# Altium PCB PCB1.PcbDoc
Units mil, origin at the board's own origin, x right, y up, seen from the top; angles counter-clockwise.
Board outline 6000 x 4000 mil, 2 copper layers (Top Layer, Bottom Layer); 128 components, 66 nets, 373 pads, 0 vias.
Unrouted connection lines stored in the file: 297.
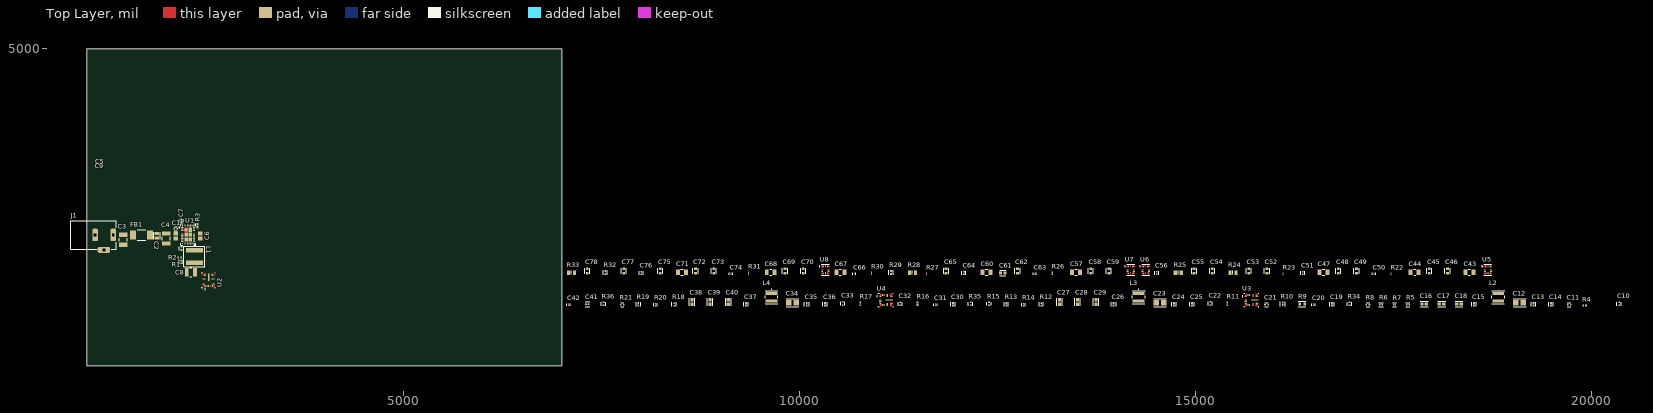
[diagram p0: Top Layer view]
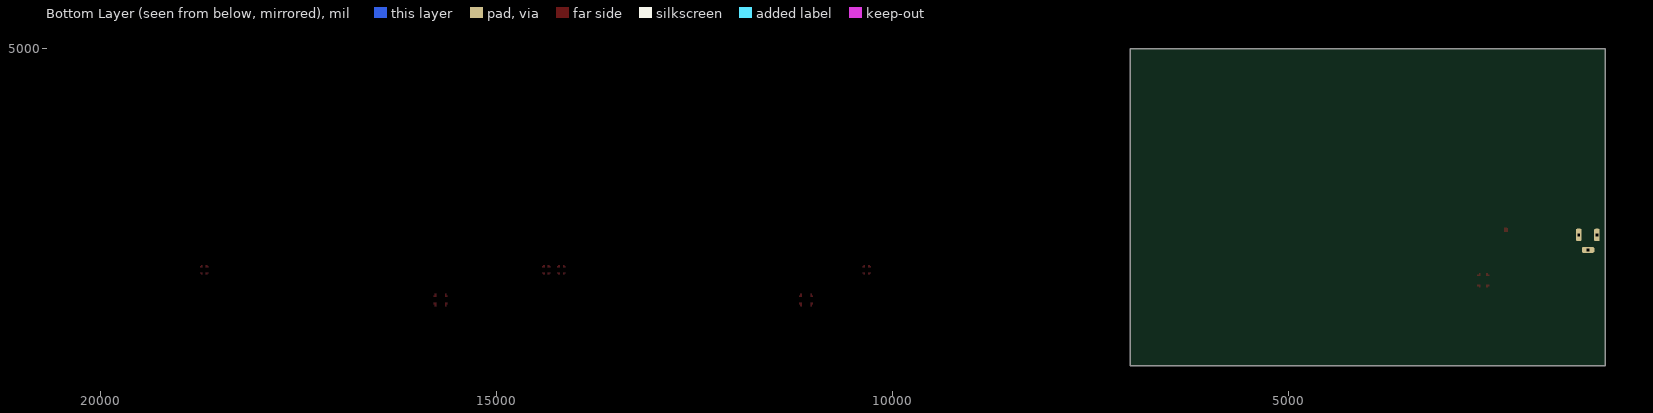
[diagram p1: Bottom Layer view, seen from below]

## Layer stack, top to bottom
Top Solder: solder mask 0.4, Solder Resist, Dk 3.5
Top Layer: signal copper 1.4
Dielectric 1: dielectric 12.6, FR-4, Dk 4.8
Bottom Layer: signal copper 1.4
Bottom Solder: solder mask 0.4, Solder Resist, Dk 3.5

## Board outline
1000,1000 7000,1000 7000,5000 1000,5000

## Design rules (kind name [scope] priority, off if disabled: settings)
Clearance [All] p1: gap=10 ignorepadtopadclearanceinfootprint=FALSE
PolygonConnect [All] p1: connectstyle=Relief reliefconductorwidth=10 reliefentries=4 polygonreliefangle="90 Angle" airgapwidth=10
RoutingVias [All] p1: holewidth=28 width=50 viastyle="Through Hole" minholewidth=28 minwidth=50 maxholewidth=28 maxwidth=50
SolderMaskExpansion [All] p1: expansion=0 istentingtop=FALSE
SupplyNets "Schematic Supply Nets_11" [InNet('1v0')] p1: voltage=0.000
SupplyNets "Schematic Supply Nets_10" [InNet('+12')] p2: voltage=0.000
SupplyNets "Schematic Supply Nets_8" [InNet('+1v3')] p3: voltage=0.000
SupplyNets "Schematic Supply Nets_7" [InNet('1v8')] p4: voltage=0.000
SupplyNets "Schematic Supply Nets_5" [InNet('3v3')] p5: voltage=0.000
SupplyNets "Schematic Supply Nets_4" [InNet('+1v8')] p6: voltage=0.000
SupplyNets "Schematic Supply Nets_3" [InNet('5V')] p7: voltage=0.000
SupplyNets "Schematic Supply Nets_2" [InNet('GND')] p8: voltage=0.000
SupplyNets "Schematic Supply Nets_1" [InNet('+3v3')] p9: voltage=0.000
SupplyNets "Schematic Supply Nets" [InNet('+5')] p10: voltage=0.000
Width [All] p1: maxlimit=10 minlimit=10 preferedwidth=10
30 further rules are at their usual default settings.

## Classes and differential pairs
component class Sheet3: C43 C44 C45 C46 C47 C48 C49 C50 C51 C52 C53 C54 C55 C56 C57 C58 C59 C60 C61 C62 C63 C64 C65 C66 C67 C68 C69 C70 C71 C72 C73 C74 C75 C76 C77 C78 R22 R23 R24 R25 R26 R27 R28 R29 R30 R31 R32 R33 U5 U6 U7 U8
component class Sheet2: C10 C11 C12 C13 C14 C15 C16 C17 C18 C19 C20 C21 C22 C23 C24 C25 C26 C27 C28 C29 C30 C31 C32 C33 C34 C35 C36 C37 C38 C39 C40 C41 C42 L2 L3 L4 R4 R5 R6 R7 R8 R9 R10 R11 R12 R13 R14 R15 R16 R17 R18 R19 R20 R21 R34 R35 R36 U2 U3 U4
component class Sheet1: C1 C2 C3 C4 C5 C6 C7 C8 C9 FB1 J1 L1 R1 R2 R3 U1

## Components (designator, comment, footprint, x,y, rotation, side; value= is the part's Value field where it differs from the comment)
C1 "1uF 0402 16V" FP-CC0402-MFG 2125,2730 r180 top value="1 uF"
C2 "4.7uF 0805 24V" FP-C0805C475K3RACAUTO-MFG 1885,2640 r270 top
C3 "2.2uF 25V 1210" CAPC1210(3225)210_M 1460,2590 r90 top value=2.2uF
C4 "2.2uF 25V 1210" CAPC1210(3225)210_M 2005,2605 r90 top value=2.2uF
C5 "0.47uf 0805" CAPC2013X145X50NL20T25 2125,2635 r90 top
C6 "0.47uf 0805" CAPC2013X145X50NL20T25 2435,2635 r90 top
C7 "4.7pF 0402" FP-C0402-BB-MFG 2195,2830 r90 top value="4.7 pF"
C8 "100uF 1210" FP-C1210C-FS-MFG 2315,2180 r180 top
C9 "0.1UF 16V 0402" FP-CC0402-0_05-0_55-L2_0-MFG 2195,2480 r270 top
C10 "1u 0402 16V" FP-CC0402-MFG 20345,1780 r90 top value="1 uF"
C11 "0u47 0402 16V" FP-CC0402-CB-MFG 19715,1770 r0 top
C12 "4u7 1206 16V" FP-C3216-160-0_2-IPC_B 19090,1795 r0 top
C13 "100n 0402 50V" FP-0402B104K500CT-IPC_C 19265,1775 r90 top
C14 "100n 0402 50V" FP-0402B104K500CT-IPC_C 19485,1775 r90 top
C15 "100n 0402 50V" FP-0402B104K500CT-IPC_C 18515,1775 r90 top
C16 "47u 0603 6V" FP-GRM188-0_2-IPC_B 17885,1780 r0 top
C17 "47u 0603 6V" FP-GRM188-0_2-IPC_B 18105,1780 r0 top
C18 "47u 0603 6V" FP-GRM188-0_2-IPC_B 18325,1780 r0 top
C19 "1n 0402 50V" FP-0402B104K500CT-IPC_C 16720,1775 r90 top
C20 "33p 0201 25V" FP-C0201-AB-MFG 16485,1770 r90 top value="33 pF"
C21 "1u 0402 16V" FP-CC0402-MFG 15895,1770 r0 top value="1 uF"
C22 "0u47 0402 16V" FP-CC0402-CB-MFG 15185,1785 r90 top
C23 "4u7 1206 16V" FP-C3216-160-0_2-IPC_B 14550,1795 r0 top
C24 "100n 0402 50V" FP-0402B104K500CT-IPC_C 14725,1775 r90 top
C25 "100n 0402 50V" FP-0402B104K500CT-IPC_C 14955,1775 r90 top
C26 "100n 0402 50V" FP-0402B104K500CT-IPC_C 13965,1775 r90 top
C27 "47u 0603 6V" FP-GRM188-0_2-IPC_B 13280,1805 r90 top
C28 "47u 0603 6V" FP-GRM188-0_2-IPC_B 13510,1805 r90 top
C29 "47u 0603 6V" FP-GRM188-0_2-IPC_B 13740,1805 r90 top
C30 "1n 0402 50V" FP-0402B104K500CT-IPC_C 11935,1775 r90 top
C31 "33p 0201 25V" FP-C0201-AB-MFG 11715,1770 r90 top value="33 pF"
C32 "1u 0402 16V" FP-CC0402-MFG 11270,1780 r90 top value="1 uF"
C33 "0u47 0402 16V" FP-CC0402-CB-MFG 10545,1785 r90 top
C34 "4u7 1206 16V" FP-C3216-160-0_2-IPC_B 9910,1795 r0 top
C35 "100n 0402 50V" FP-0402B104K500CT-IPC_C 10090,1775 r90 top
C36 "100n 0402 50V" FP-0402B104K500CT-IPC_C 10320,1775 r90 top
C37 "100n 0402 50V" FP-0402B104K500CT-IPC_C 9325,1775 r90 top
C38 "47u 0603 6V" FP-GRM188-0_2-IPC_B 8640,1805 r90 top
C39 "47u 0603 6V" FP-GRM188-0_2-IPC_B 8870,1805 r90 top
C40 "47u 0603 6V" FP-GRM188-0_2-IPC_B 9100,1805 r90 top
C41 "1n 0402 50V" FP-0402B104K500CT-IPC_C 7320,1775 r0 top
C42 "33p 0201 25V" FP-C0201-AB-MFG 7080,1770 r90 top value="33 pF"
C43 "47u 1206 16V" FP-GRM31C-0_3-e0_3_0_8-IPC_C 18455,2180 r0 top
C44 "47u 1206 16V" FP-GRM31C-0_3-e0_3_0_8-IPC_C 17765,2180 r0 top
C45 "10u 0603 16V" FP-CC0603-DC-MFG 17950,2195 r90 top
C46 "10u 0603 16V" FP-CC0603-DC-MFG 18180,2195 r90 top
C47 "47u 1206 16V" FP-GRM31C-0_3-e0_3_0_8-IPC_C 16615,2180 r0 top
C48 "10u 0603 16V" FP-CC0603-DC-MFG 16800,2195 r90 top
C49 "10u 0603 16V" FP-CC0603-DC-MFG 17030,2195 r90 top
C50 "10n 0201 16V" FP-CC0201-BA-MFG 17250,2160 r90 top value="10 nF"
C51 "100n 0402 16V" FP-C0402-BB-MFG 16350,2170 r90 top value="0.10 μF"
C52 "10u 0603 16V" FP-CC0603-DC-MFG 15900,2195 r90 top
C53 "10u 0603 16V" FP-CC0603-DC-MFG 15670,2195 r90 top
C54 "10u 0603 16V" FP-CC0603-DC-MFG 15210,2195 r90 top
C55 "10u 0603 16V" FP-CC0603-DC-MFG 14980,2195 r90 top
C56 "100n 0402 16V" FP-C0402-BB-MFG 14510,2170 r90 top value="0.10 μF"
C57 "47u 1206 16V" FP-GRM31C-0_3-e0_3_0_8-IPC_C 13490,2180 r0 top
C58 "10u 0603 16V" FP-CC0603-DC-MFG 13675,2195 r90 top
C59 "10u 0603 16V" FP-CC0603-DC-MFG 13905,2195 r90 top
C60 "47u 1206 16V" FP-GRM31C-0_3-e0_3_0_8-IPC_C 12360,2180 r0 top
C61 "10u 0603 16V" FP-CC0603-DC-MFG 12565,2170 r0 top
C62 "10u 0603 16V" FP-CC0603-DC-MFG 12750,2195 r90 top
C63 "10n 0201 16V" FP-CC0201-BA-MFG 12970,2160 r90 top value="10 nF"
C64 "100n 0402 16V" FP-C0402-BB-MFG 12075,2170 r90 top value="0.10 μF"
C65 "10u 0603 16V" FP-CC0603-DC-MFG 11850,2195 r90 top
C66 "10n 0201 16V" FP-CC0201-BA-MFG 10690,2160 r90 top value="10 nF"
C67 "47u 1206 16V" FP-GRM31C-0_3-e0_3_0_8-IPC_C 10515,2180 r0 top
C68 "47u 1206 16V" FP-GRM31C-0_3-e0_3_0_8-IPC_C 9635,2180 r0 top
C69 "10u 0603 16V" FP-CC0603-DC-MFG 9815,2195 r90 top
C70 "10u 0603 16V" FP-CC0603-DC-MFG 10045,2195 r90 top
C71 "47u 1206 16V" FP-GRM31C-0_3-e0_3_0_8-IPC_C 8515,2180 r0 top
C72 "10u 0603 16V" FP-CC0603-DC-MFG 8685,2195 r90 top
C73 "10u 0603 16V" FP-CC0603-DC-MFG 8915,2195 r90 top
C74 "10n 0201 16V" FP-CC0201-BA-MFG 9135,2160 r90 top value="10 nF"
C75 "10u 0603 16V" FP-CC0603-DC-MFG 8240,2195 r90 top
C76 "100n 0402 16V" FP-C0402-BB-MFG 8000,2170 r90 top value="0.10 μF"
C77 "10u 0603 16V" FP-CC0603-DC-MFG 7780,2195 r90 top
C78 "10u 0603 16V" FP-CC0603-DC-MFG 7320,2195 r90 top
FB1 "74279226101" WE-MPSB_1812_L4.5W3.2H2.3 1690,2650 r0 top
J1 "694108301002" 694108301002 1085,2650 r270 top
L1 "XEL6030-102MEC" FP-XEL6030-3_1-MFG 2360,2380 r270 top
L2 "2u2 NonStandard 3.8A Isat" SRP4020FA2R2M 18820,1865 r0 top
L3 "2u2 NonStandard 3.8A Isat" SRP4020FA2R2M 14280,1865 r0 top
L4 "2u2 NonStandard 3.8A Isat" SRP4020FA2R2M 9645,1865 r0 top
R1 "1M 0402" FP-MCS0402-IPC_C 2195,2310 r270 top
R2 "243k 0402" RESC1005X40X25NL05T05 2175,2365 r0 top
R3 "M55342E04B26B5RT5" RESC1005X40X25ML10T10 2400,2765 r270 top
R4 "10k 0402 PullUp" RESC1005X40X20NL05T10 19910,1760 r0 top
R5 "0 0402 DNP" FP-CRCW0402-e3-IPC_C 17680,1770 r0 top
R6 "100k 0402 1%" FP-CRGCQ0402-IPC_C 17340,1770 r0 top value=100KΩ
R7 "1k 0201 DNP" FP-AF0201-IPC_B 17510,1770 r0 top
R8 "100 0402 DNP" FP-AC0402-MFG 17175,1770 r0 top
R9 "40k 0603" FP-AT0603-IPC_B 16345,1780 r0 top
R10 "5k 0402" FP-PNM0402-IPC_C 16100,1780 r90 top
R11 "10k 0402 PullUp" RESC1005X40X20NL05T10 15400,1780 r90 top
R12 "0 0402 DNP" FP-CRCW0402-e3-IPC_C 13050,1775 r90 top
R13 "100k 0402 1%" FP-CRGCQ0402-IPC_C 12610,1775 r90 top value=100KΩ
R14 "1k 0201 DNP" FP-AF0201-IPC_B 12825,1770 r90 top
R15 "100 0402 DNP" FP-AC0402-MFG 12390,1780 r90 top
R16 "125k 0402 1%" RESC1005X40X25NL10T10 11490,1780 r90 top
R17 "10k 0402 PullUp" RESC1005X40X20NL05T10 10765,1780 r90 top
R18 "0 0402 DNP" FP-CRCW0402-e3-IPC_C 8415,1775 r90 top
R19 "100k 0402 1%" FP-CRGCQ0402-IPC_C 7965,1775 r90 top value=100KΩ
R20 "1k 0201 DNP" FP-AF0201-IPC_B 8180,1770 r90 top
R21 "100 0402 DNP" FP-AC0402-MFG 7760,1770 r0 top
R22 "11k8 0201 1%" RESC0603X28X15LL05T05 17465,2160 r90 top
R23 "3k74 0201 1%" RESC0603X28X15LL05T05 16105,2160 r90 top
R24 "250k 0805 0%1" RESC2012X65N 15470,2175 r0 top
R25 "250k 0805 0%1" RESC2012X65N 14780,2175 r0 top
R26 "12k4 0201 1%" RESC0603X26X15NL03T05 13190,2165 r90 top
R27 "10k 0201 1%" RESC0603X28X15LL05T05 11600,2160 r90 top
R28 "250k 0805 0%1" RESC2012X65N 11425,2175 r0 top
R29 "19.3 0402 0%5" FP-RN73R1E-IPC_B 11155,2175 r90 top
R30 "12k1 0201 1%" RESC0603X26X15NL03T05 10910,2165 r90 top
R31 "12k1 0201 1%" RESC0603X26X15NL03T05 9355,2165 r90 top
R32 "19.3 0402 0%5" FP-RN73R1E-IPC_B 7545,2175 r90 top
R33 "250k 0805 0%1" RESC2012X65N 7120,2175 r0 top
R34 "AF0402FR-0726K1L" FP-AF0402-MFG 16940,1780 r90 top
R35 "AF0402FR-0726K1L" FP-AF0402-MFG 12160,1780 r90 top
R36 "AF0402FR-0726K1L" FP-AF0402-MFG 7525,1780 r90 top
U1 "LT8645SIV#PBF" FP-LQFN-32-05-08-1512-MFG 2280,2655 r0 top
U2 "LM61460AANRJRR" FP-RJR0014A-MFG 2539.33,2077.83 r90 top
U3 "LM61460AANRJRR" FP-RJR0014A-MFG 15705,1830 r0 top
U4 "LM61460AANRJRR" FP-RJR0014A-MFG 11090,1830 r0 top
U5 "TPS7A5201RPST" FP-RPS0012A-MFG 18690,2210 r0 top
U6 "TPS7A5201RPST" FP-RPS0012A-MFG 14370,2210 r0 top
U7 "TPS7A5201RPST" FP-RPS0012A-MFG 14180,2210 r0 top
U8 "TPS7A5201RPST" FP-RPS0012A-MFG 10325,2210 r0 top

## Footprints (in the part's own frame and the unit in brackets; to place one, negate y for a bottom-side part, rotate by r counter-clockwise, add the part's x,y. Pads: shape width x height; smd on the part's side, far side on the other; paste and mask are expansions set on the pad)
694108301002 [mm] "DC Power Jack Right Angled(6.4)"
  rrect50% 4x1.8 hole 0.8 square: 1(0,6.35) 2(0,0.55)
  rrect50% 1.8x4 hole 0.8 square: 3(4.8,3.35)
  silkscreen extent -4.5,-7.25 4.5,7.25, body extent -4.5,-7.25 5,7.25, height 10.75
CAPC1210(3225)210_M [mm] "Chip Capacitor, Body 3.2x2.5mm, Height 2.1mm, IPC Low Density"
  rect 1.35x2.8 smd: 1(-1.6,0) 2(1.6,0)
  silkscreen extent -0.55,-1.3 0.55,1.3, body extent -1.7,-1.35 1.7,1.35, height 2.1
CAPC2013X145X50NL20T25 [mm] "Chip Capacitor, 2-Leads, Body 2.00x1.25mm, IPC Medium Density"
  rect 1.3x1.45 smd: 1(-0.8,0) 2(0.8,0)
  body extent -1.1,-0.72 1.1,0.72, height 1.45
FP-0402B104K500CT-IPC_C [mil]
  rect 23.85x23.87 smd paste+0 mask+0: 1(-15.76,0) 2(15.76,0)
  silkscreen extent -28,-30 28,30, body extent -32,-18 32,18, height 10
FP-AC0402-MFG [mm]
  rect 0.5x0.6 smd paste+0 mask+0: 1(-0.5,0) 2(0.5,0)
  silkscreen extent -0.5,-0.67 0.5,0.67, body extent -0.85,-0.4 0.85,0.4, height 0.25
FP-AF0201-IPC_B [mil]
  rect 17.88x14.28 smd paste+0 mask+0: 1(-11.98,0) 2(11.98,0)
  silkscreen extent -21,-23 21,23, body extent -27,-13 27,13, height 10
FP-AF0402-MFG [mm]
  rect 0.5x0.6 smd paste+0 mask+0: 1(-0.5,0) 2(0.5,0)
  silkscreen extent -0.53,-0.72 0.53,0.72, body extent -0.85,-0.4 0.85,0.4, height 0.25
FP-AT0603-IPC_B [mil]
  rect 33.81x35.91 smd paste+0 mask+0: 1(-30.58,0) 2(30.58,0)
  silkscreen extent -47,-34 47,34, body extent -57,-28 57,28, height 10
FP-C0201-AB-MFG [mm]
  rect 0.36x0.32 smd paste+0 mask+0: 1(-0.28,0) 2(0.28,0)
  silkscreen extent -0.3,-0.55 0.3,0.55
FP-C0402-BB-MFG [mm]
  rect 0.52x0.52 smd paste+0 mask+0: 1(-0.4,0) 2(0.4,0)
  silkscreen extent -0.5,-0.64 0.5,0.64, body extent -0.8,-0.4 0.8,0.4, height 0.25
FP-C0805C475K3RACAUTO-MFG [mm]
  rect 0.95x1.35 smd paste+0 mask+0: 1(-0.75,0) 2(0.75,0)
  silkscreen extent -1.15,-1.05 1.15,1.05, body extent -1.4,-0.85 1.4,0.85, height 0.25
FP-C1210C-FS-MFG [mm]
  rect 1.2x2.7 smd paste+0 mask+0: 1(-1.3,0) 2(1.3,0)
  silkscreen extent -0.33,-1.4 0.33,1.4, body extent -2,-1.5 2,1.5, height 0.25
FP-C3216-160-0_2-IPC_B [mil]
  rect 69.05x71.11 smd paste+0 mask+0: 1(-46.3,0) 2(46.3,0)
  silkscreen extent -81,-51 81,51, body extent -91,-45 91,45, height 10
FP-CC0201-BA-MFG [mm]
  rect 0.28x0.3 smd paste+0 mask+0: 1(-0.265,0) 2(0.265,0)
  silkscreen extent -0.32,-0.53 0.32,0.53, body extent -0.51,-0.27 0.51,0.27, height 0.25
FP-CC0402-0_05-0_55-L2_0-MFG [mm]
  rect 0.5x0.6 smd paste+0 mask+0: 1(-0.5,0) 2(0.5,0)
  silkscreen extent -0.53,-0.7 0.53,0.7, body extent -0.85,-0.4 0.85,0.4, height 0.25
FP-CC0402-CB-MFG [mm]
  rect 0.5x0.5 smd paste+0 mask+0: 1(-0.5,0) 2(0.5,0)
  silkscreen extent -0.53,-0.68 0.53,0.67, body extent -0.95,-0.55 0.95,0.55, height 0.25
FP-CC0402-MFG [mm]
  rect 0.5x0.5 smd paste+0 mask+0: 1(-0.5,0) 2(0.5,0)
  silkscreen extent -0.53,-0.68 0.53,0.67, body extent -0.87,-0.48 0.87,0.48, height 0.25
FP-CC0603-DC-MFG [mm]
  rect 0.9x0.9 smd paste+0 mask+0: 1(-0.7,0) 2(0.7,0)
  silkscreen extent -0.9,-0.82 0.9,0.82, body extent -1.35,-0.75 1.35,0.75, height 0.25
FP-CRCW0402-e3-IPC_C [mil]
  rect 18.43x18.6 smd paste+0 mask+0: 1(-15.83,0) 2(15.83,0)
  silkscreen extent -25,-27 25,27, body extent -29,-15 29,15, height 10
FP-CRGCQ0402-IPC_C [mil]
  rect 22.03x18.6 smd paste+0 mask+0: 1(-14.81,0) 2(14.81,0)
  silkscreen extent -26,-27 26,27, body extent -30,-15 30,15, height 10
FP-GRM31C-0_3-e0_3_0_8-IPC_C [mil]
  rect 49.35x71.03 smd paste+0 mask+0: 1(-50.21,0) 2(50.21,0)
  silkscreen extent -14,-37 14,37, body extent -79,-41 79,41, height 10
FP-GRM188-0_2-IPC_B [mil]
  rect 43.51x39.61 smd paste+0 mask+0: 1(-27.58,0) 2(27.58,0)
  silkscreen extent -49,-36 49,36, body extent -59,-30 59,30, height 10
FP-LQFN-32-05-08-1512-MFG [mm]
  rect 0.7x0.25 smd paste+0 mask+0: 1(-1.9,2.25) 2(-1.9,1.75) 3(-1.9,1.25) 4(-1.9,0.75) 5(-1.9,0.25) 6(-1.9,-0.25) 7(-1.9,-0.75) 8(-1.9,-1.25) 9(-1.9,-1.75) 10(-1.9,-2.25) 17(1.9,-2.25) 18(1.9,-1.75) 19(1.9,-1.25) 20(1.9,-0.75) 21(1.9,-0.25) 22(1.9,0.25) 23(1.9,0.75) 24(1.9,1.25) 25(1.9,1.75) 26(1.9,2.25)
  rect 0.25x0.7 smd paste+0 mask+0: 11(-1.25,-2.9) 12(-0.75,-2.9) 13(-0.25,-2.9) 14(0.25,-2.9) 15(0.75,-2.9) 16(1.25,-2.9) 27(1.25,2.9) 28(0.75,2.9) 29(0.25,2.9) 30(-0.25,2.9) 31(-0.75,2.9) 32(-1.25,2.9)
  round 1.012 smd paste+0 mask+0: 33(-0.663,1.548)
  rect 1.125x1.355 smd paste+0 mask+0: 34(0.663,1.548) 37(-0.663,-1.548) 38(0.663,-1.548)
  rect 1.125x1.34 smd paste+0 mask+0: 35(-0.663,0) 36(0.663,0)
  rect 0.375x0.375 smd paste+0 mask+0: 39(-1.813,2.812) 40(1.813,2.812) 41(-1.813,-2.812) 42(1.813,-2.812)
  Top Layer region: -0.1,2.225 -0.975,2.225 -1.225,1.975 -1.225,0.87 -0.1,0.87 -0.1,2.225
  silkscreen extent -2.97,-3.4 2.4,3.4, body extent -2.35,-3.35 2.35,3.35, height 0.25
FP-MCS0402-IPC_C [mil]
  rect 18.32x18.6 smd paste+0 mask+0: 1(-15.89,0) 2(15.89,0)
  silkscreen extent -25,-27 25,27, body extent -29,-15 29,15, height 10
FP-PNM0402-IPC_C [mil]
  rect 26.11x23.44 smd paste+0 mask+0: 1(-16,0) 2(16,0)
  silkscreen extent -29,-29 29,29, body extent -33,-17 33,17, height 10
FP-RJR0014A-MFG [mm]
  round 0.394 smd paste-1000 mask+0: 1(-1.806,1.169) 5(-1.719,-1.206)
  rrect40% 0.7x0.25 smd paste+0 mask+0: 2(-1.85,0.525) 4(-1.85,-0.525)
  rrect33% 0.7x0.3 smd paste+0 mask+0: 3(-1.85,0)
  rrect40% 0.25x0.7 smd paste+0 mask+0: 6(-1.125,-1.6) 7(-0.625,-1.6) 13(-0.625,1.6) 14(-1.125,1.6)
  rrect25% 0.4x1 smd paste+0 mask+0: 8(0.45,-1.45) 12(0.45,1.45)
  round 0.45 smd paste-1000 mask+0: 9(1.65,-1.2) 11(1.65,1.2)
  rrect25% 2.4x0.4 smd paste-1000 mask+0: 10(1,0)
  Top Layer region: 1.45,-1.95 1.75,-1.95 1.769,-1.946 1.785,-1.935 1.796,-1.919 1.8,-1.9 1.8,-1.9 1.8,-1.47 1.816,-1.41 1.86,-1.366 1.92,-1.35 1.92,-1.35 2.15,-1.35 2.169,-1.346 2.185,-1.335 2.196,-1.319 2.2,-1.3 2.2,-1.3 2.2,-1 2.193,-0.975 2.175,-0.957 2.15,-0.95 2.15,-0.95 1.45,-0.95 1.431,-0.954 1.415,-0.965 1.404,-0.981 1.4,-1 1.4,-1 1.4,-1.9 1.404,-1.919 1.415,-1.935 1.431,-1.946 1.45,-1.95 1.45,-1.95
  Top Layer region: 1.45,1.95 1.75,1.95 1.769,1.946 1.785,1.935 1.796,1.919 1.8,1.9 1.8,1.9 1.8,1.47 1.816,1.41 1.86,1.366 1.92,1.35 1.92,1.35 2.15,1.35 2.169,1.346 2.185,1.335 2.196,1.319 2.2,1.3 2.2,1.3 2.2,1 2.193,0.975 2.175,0.957 2.15,0.95 2.15,0.95 1.45,0.95 1.431,0.954 1.415,0.965 1.404,0.981 1.4,1 1.4,1 1.4,1.9 1.404,1.919 1.415,1.935 1.431,1.946 1.45,1.95 1.45,1.95
  Top Layer region: -1.55,-1.95 -1.531,-1.946 -1.515,-1.935 -1.504,-1.919 -1.5,-1.9 -1.5,-1.9 -1.5,-1 -1.507,-0.975 -1.525,-0.957 -1.55,-0.95 -1.55,-0.95 -2.15,-0.95 -2.175,-0.957 -2.193,-0.975 -2.2,-1 -2.2,-1 -2.2,-1.3 -2.196,-1.319 -2.185,-1.335 -2.169,-1.346 -2.15,-1.35 -2.15,-1.35 -1.97,-1.35 -1.924,-1.359 -1.885,-1.385 -1.859,-1.424 -1.85,-1.47 -1.85,-1.47 -1.85,-1.9 -1.846,-1.919 -1.835,-1.935 -1.819,-1.946 -1.8,-1.95 -1.8,-1.95 -1.8,-1.95
  Top Layer region: -1.8,1.95 -1.55,1.95 -1.531,1.946 -1.515,1.935 -1.504,1.919 -1.5,1.9 -1.5,1.9 -1.5,1 -1.507,0.975 -1.525,0.957 -1.55,0.95 -1.55,0.95 -2.15,0.95 -2.175,0.957 -2.193,0.975 -2.2,1 -2.2,1 -2.2,1.3 -2.196,1.319 -2.185,1.335 -2.169,1.346 -2.15,1.35 -2.15,1.35 -1.97,1.35 -1.924,1.359 -1.885,1.385 -1.859,1.424 -1.85,1.47 -1.85,1.47 -1.85,1.9 -1.846,1.919 -1.835,1.935 -1.819,1.946 -1.8,1.95 -1.8,1.95
  silkscreen extent -3.02,-2.15 2.4,2.15, body extent -2.3,-2.05 2.3,2.05, height 0.25
FP-RN73R1E-IPC_B [mil]
  rect 23.14x22.54 smd paste+0 mask+0: 1(-18.27,0) 2(18.27,0)
  silkscreen extent -30,-27 30,27, body extent -36,-17 36,17, height 10
FP-RPS0012A-MFG [mm]
  round 0.34 smd paste+0 mask+0: 1(-0.761,1.127) 5(-0.761,-1.127)
  rrect40% 1.05x0.25 smd paste+0 mask+0: 2(-0.775,0.5) 10(0.775,0.5)
  rrect40% 0.6x0.25 smd paste+0 mask+0: 3(-1,0) 4(-1,-0.5) 8(1,-0.5) 9(1,0)
  rrect40% 0.25x0.8 smd paste+0 mask+0: 6(0,-1.05)
  round 0.332 smd paste+0 mask+0: 7(0.766,-1.091) 11(0.766,1.091)
  rrect40% 0.25x0.6 smd paste+0 mask+0: 12(0,1.15)
  Top Layer region: 1.25,-1.1 0.95,-1.1 0.95,-1.4 0.946,-1.419 0.935,-1.435 0.919,-1.446 0.9,-1.45 0.9,-1.45 0.6,-1.45 0.581,-1.446 0.565,-1.435 0.554,-1.419 0.55,-1.4 0.55,-1.4 0.55,-0.925 0.554,-0.906 0.565,-0.89 0.581,-0.879 0.6,-0.875 0.6,-0.875 1.25,-0.875 1.269,-0.879 1.285,-0.89 1.296,-0.906 1.3,-0.925 1.3,-0.925 1.3,-1.05 1.296,-1.069 1.285,-1.085 1.269,-1.096 1.25,-1.1
  Top Layer region: 1.25,1.1 0.95,1.1 0.95,1.4 0.946,1.419 0.935,1.435 0.919,1.446 0.9,1.45 0.9,1.45 0.6,1.45 0.581,1.446 0.565,1.435 0.554,1.419 0.55,1.4 0.55,1.4 0.55,0.925 0.554,0.906 0.565,0.89 0.581,0.879 0.6,0.875 0.6,0.875 1.25,0.875 1.269,0.879 1.285,0.89 1.296,0.906 1.3,0.925 1.3,0.925 1.3,1.05 1.296,1.069 1.285,1.085 1.269,1.096 1.25,1.1
  Top Layer region: -1.25,-1.1 -0.95,-1.1 -0.95,-1.4 -0.946,-1.419 -0.935,-1.435 -0.919,-1.446 -0.9,-1.45 -0.9,-1.45 -0.6,-1.45 -0.581,-1.446 -0.565,-1.435 -0.554,-1.419 -0.55,-1.4 -0.55,-1.4 -0.55,-0.925 -0.554,-0.906 -0.565,-0.89 -0.581,-0.879 -0.6,-0.875 -0.6,-0.875 -1.25,-0.875 -1.269,-0.879 -1.285,-0.89 -1.296,-0.906 -1.3,-0.925 -1.3,-0.925 -1.3,-1.05 -1.296,-1.069 -1.285,-1.085 -1.269,-1.096 -1.25,-1.1
  Top Layer region: -1.25,1.1 -0.95,1.1 -0.95,1.4 -0.943,1.425 -0.925,1.443 -0.9,1.45 -0.9,1.45 -0.6,1.45 -0.581,1.446 -0.565,1.435 -0.554,1.419 -0.55,1.4 -0.55,1.4 -0.55,0.925 -0.554,0.906 -0.565,0.89 -0.581,0.879 -0.6,0.875 -0.6,0.875 -1.25,0.875 -1.269,0.879 -1.285,0.89 -1.296,0.906 -1.3,0.925 -1.3,0.925 -1.3,1.05 -1.293,1.075 -1.275,1.093 -1.25,1.1
  silkscreen extent -1.97,-1.8 1.3,1.8, body extent -1.4,-1.55 1.4,1.55, height 0.25
FP-XEL6030-3_1-MFG [mm]
  rect 1.43x5.5 smd paste+0 mask+0: 1(-2.02,0) 2(2.02,0)
  silkscreen extent -3.9,-3.38 3.28,3.38, body extent -3.38,-3.48 3.38,3.48, height 0.25
RESC0603X26X15NL03T05 [mm] "Chip Resistor, 2-Leads, Body 0.60x0.30mm, IPC Medium Density"
  rect 0.45x0.35 smd: 1(-0.325,0) 2(0.325,0)
  body extent -0.32,-0.16 0.32,0.17, height 0.26
RESC0603X28X15LL05T05 [mm] "Chip Resistor, 2-Leads, Body 0.60x0.30mm, IPC High Density"
  rect 0.35x0.25 smd: 1(-0.275,0) 2(0.275,0)
  body extent -0.33,-0.17 0.32,0.18, height 0.28
RESC1005X40X20NL05T10 [mm] "Chip Resistor, 2-Leads, Body 1.00x0.50mm, IPC Medium Density"
  rect 0.55x0.55 smd: 1(-0.45,0) 2(0.45,0)
  body extent -0.53,-0.27 0.53,0.28, height 0.4
RESC1005X40X25ML10T10 [mm] "Chip Resistor, 2-Leads, Body 1.00x0.50mm, IPC Low Density"
  rect 0.75x0.7 smd: 1(-0.475,0) 2(0.475,0)
  body extent -0.55,-0.3 0.55,0.3, height 0.4
RESC1005X40X25NL05T05 [mm] "Chip Resistor, 2-Leads, Body 1.00x0.50mm, IPC Medium Density"
  rect 0.55x0.55 smd: 1(-0.45,0) 2(0.45,0)
  body extent -0.53,-0.27 0.53,0.28, height 0.4
RESC1005X40X25NL10T10 [mm] "Chip Resistor, 2-Leads, Body 1.00x0.50mm, IPC Medium Density"
  rect 0.65x0.6 smd: 1(-0.425,0) 2(0.425,0)
  body extent -0.55,-0.3 0.55,0.3, height 0.4
RESC2012X65N [mm]
  rect 1x1.45 smd: 1(-0.95,0) 2(0.95,0)
  silkscreen extent 0,-0.53 0,0.53, body extent -1,-0.63 1,0.62, height 0.55
SRP4020FA2R2M [mm]
  rect 3.8x1 smd: 1(0,1.2) 2(0,-1.2)
  silkscreen extent -2.05,-2.05 2.05,2.6, body extent -2.05,-2.05 2.05,2.05, height 1.91
WE-MPSB_1812_L4.5W3.2H2.3 [mm] "SMD EMI Multilayer Power Suppression Bead, body 4.50x3.20mm"
  rect 1.9x3 smd: 1(-2.7,0) 2(2.7,0)
  silkscreen extent -1.4,-1.73 1.4,1.73, body extent -2.25,-1.6 2.25,1.6, height 2.3

## Part data
C1: library part CMP-03422-000064-1, "CC0402 1 uF X5R 10.00% 16 V", Capacitance="1 uF", Manufacturer=YAGEO, Manufacturer Part Number=CC0402KPX5R7BB105, Package=CC0402, Temperature="-55°C to +125°C", Temperature Characteristic=X5R, Temperature Coefficient=30ppm/°C, Temperature Range High=+125°C, Temperature Range Low=-55°C, Tolerance=0.1, Voltage Rating="16 V", Automotive=No, Automotive Grade=NA, Category=Cap, ComponentLink2Description=Datasheet, ComponentLink2URL=http://www.yageo.com/documents/recent/UPY-GP_NP0_16V-to-50V_16.pdf, Device Class L1="Passive Components", Device Class L2=Capacitors, Device Class L3="Ceramic Capacitors", Footprint Url=http://www.yageo.com/exep/pages/download/literatures/UPY-C_GEN_24.pdf, Height=0.55mm, Ipc Land Pattern Name=CAPC10050X50, Lead Free=Yes, Material=Ceramic, Octopart=https://octopart.com/cc0402kpx5r7bb105-yageo-89998189, RoHS=TRUE
C2: library part CMP-03020-034682-1, "CAP CER 0805 4.7UF 25V X7R  10%", RoHS Compliant=Yes
C3 C4: library part CMP-1038-02085-1, "CAP 2.2uF 25V ±5% 1210 (3225 Metric) Thickness 2.05mm SMD", Case-EIA=1210, Case-Metric=3225, Rated Voltage="25 V", Tolerance=Â±5%, Max Thickness="2.05 mm", Technology=SMT
C5 C6: library part CMP-2007-01148-1, Manufacturer=Kemet, Part Number=C0805C474K3RALTU
C7: library part CMP-03020-005498-1, "C0402 4.7 pF C0G 0.1 pF 50 V", Capacitance="4.7 pF", Manufacturer=Kemet, Manufacturer Part Number=C0402C479B5GACAUTO, Package=C0402-BB, Temperature="-55°C to +125°C", Temperature Characteristic=C0G, Temperature Coefficient=15%, Temperature Range High=+125°C, Temperature Range Low=-55°C, Tolerance="0.1 pF", Voltage Rating="50 V", Automotive=No, Category=Cap, ComponentLink2Description=Datasheet, ComponentLink2URL=https://content.kemet.com/datasheets/KEM_C1002_X7R_SMD.pdf, Device Class L1="Passive Components", Device Class L2=Capacitors, Device Class L3="Ceramic Capacitors", Height=0.55mm, Ipc Land Pattern Name=CAPC10050X50, Lead Free=Yes, Material=Ceramic, Mouser Description="Cap Ceramic 4.7pF 50V C0G 0.1pF SMD 0402 125°C T/R", Octopart=https://octopart.com/c0402c479b5gacauto-kemet-87334100, RoHS=TRUE
C8: library part CMP-03020-034653-1, "CAP CER 100UF 16V X5R 1210", Capacitance=100uF, Case Code (Imperial)=1210, Case Code (Metric)=3225, Dielectric=X5R, Dielectric Material=Ceramic, Max Operating Temperature=85°C, Min Operating Temperature=-55°C, Package Quantity=1000, Tolerance=20%, Voltage Rating=16V, Case/Package=1210, Depth=2.5mm, Lead Free="Lead Free", Length=3.2mm, Packaging="Tape and Reel", REACH SVHC="No SVHC", Termination=SMD/SMT, Thickness=0.106inch, Voltage Rating (DC)=16V, Weight=0.000564oz, Width=0.098inch
C9: library part CMP-03422-001485-1, "CAP CER 0.1UF 16V X7R 0402", Capacitance=100nF, Case Code (Imperial)=0402, Case Code (Metric)=1005, Dielectric=X7R, Max Operating Temperature=125°C, Min Operating Temperature=-55°C, Package Quantity=10000, Resistor Type=Ceramic, Tolerance=5%, Voltage Rating=16V, Case/Package=0402, Construction=Flat, Depth=0.5mm, Halogen Free="Halogen Free", Height=0.5mm, Lead Free="Lead Free", Length=1mm, Mount="Surface Mount", Packaging="Tape and Reel", Radiation Hardening=No, RoHS Compliant=Yes, Series=CC, Thickness=0.022inch, Voltage Rating (DC)=16V, Width=0.02inch
C10 C21 C32: library part CMP-03422-001191-1, "CAP CER 1UF 16V X5R 0402", Capacitance="1 uF", Manufacturer=YAGEO, Manufacturer Part Number=CC0402KRX5R7BB105, Package=CC0402, Temperature="-55°C to +125°C", Temperature Characteristic=X5R, Temperature Coefficient=30ppm/°C, Temperature Range High=+125°C, Temperature Range Low=-55°C, Tolerance=0.1, Voltage Rating="16 V", Automotive=No, Automotive Grade=NA, Category=Cap, ComponentLink2Description=Datasheet, ComponentLink2URL=http://www.yageo.com/documents/recent/UPY-GP_NP0_16V-to-50V_16.pdf, Device Class L1="Passive Components", Device Class L2=Capacitors, Device Class L3="Ceramic Capacitors", Digikey Description="CAP CER 1UF 16V X5R 0402", Footprint Url=http://www.yageo.com/exep/pages/download/literatures/UPY-C_GEN_24.pdf, Height=0.55mm, Ipc Land Pattern Name=CAPC10050X50, Lead Free=Yes, Material=Ceramic, Mouser Description="0402 1 uF 16 V ±10% Tolerance X5R Multilayer Ceramic Chip Capacitor", Octopart=https://octopart.com/cc0402krx5r7bb105-yageo-25629500, RoHS=TRUE
C11 C22 C33: library part CMP-03422-000370-2, "CAP CER 0.47UF 16V X5R 0402", Capacitance=470nF, Case/Package=0402, Max Operating Temperature=85°C, Min Operating Temperature=-55°C, Tolerance=10%, Voltage Rating=16V, Halogen Free="Halogen Free", Lead Free="Lead Free", Length=0.039inch, Mount="Surface Mount", Packaging="Tape and Reel", RoHS Compliant=Yes, Thickness=0.022inch, Voltage Rating (DC)=16V, Width=0.02inch
C12 C23 C34: library part CMP-08246-006479-1, "Multilayer Ceramic Capacitors 4.7uF ±20% 16V X7R SMD 1206", Capacitance=4.7uF, Case Code (Imperial)=1206, Case Code (Metric)=3216, Dielectric=X7R, Max Operating Temperature=125°C, Min Operating Temperature=-55°C, Package Quantity=1, Resistor Type=Ceramic, Tolerance=20%, Voltage Rating=16V, Case/Package=1206, Depth=1.6mm, Features="Soft Termination", Height=1.6mm, Length=0.126inch, Mount="Surface Mount", Number of Pins=2, Packaging="Tape and Reel", RoHS Compliant=Yes, Series=C, Termination=SMD/SMT, Thickness=0.071inch, Voltage Rating (DC)=16V, Weight=0.000571oz, Width=0.063inch
C13 C14 C15 C19 C24 C25 C26 C30 C35 C36 C37 C41: library part CMP-45632-000010-1, "CAP CER 0.1UF 50V X7R 0402", Capacitance=100nF, Case Code (Imperial)=0402, Case Code (Metric)=1005, Max Operating Temperature=125°C, Min Operating Temperature=-55°C, Tolerance=10%, Voltage Rating=50V, Case/Package=0402, Mount="Surface Mount", Packaging="Cut Tape", RoHS Compliant=Yes, Series=-
C16 C17 C18 C27 C28 C29 C38 C39 C40: library part CMP-2000-05444-2, "Chip Multilayer Ceramic Capacitors for General Purpose, 0603, 47uF, X5R, 15%, 20%, 6.3V", Capacitance=47uF, Case Code (Imperial)=0603, Case Code (Metric)=1608, Dielectric=X5R, Max Operating Temperature=85°C, Min Operating Temperature=-55°C, Tolerance=20%, Voltage Rating=6.3V, Case/Package=0603, Length=0.063inch, Mount="Surface Mount", Packaging="Tape and Reel", Thickness=0.039inch, Voltage Rating (DC)=6.3V, Width=0.031inch
C20 C31 C42: library part CMP-03020-011228-1, "CAP CER 33PF 25V 5% NP0 0201", Capacitance="33 pF", Manufacturer=KEMET, Manufacturer Part Number=C0201C330J3GACTU, Package=C0201-AB, Temperature="-55°C to +125°C", Temperature Characteristic=C0G, Temperature Coefficient=30ppm/°C, Temperature Range High=+125°C, Temperature Range Low=-55°C, Tolerance=0.05, Voltage Rating="25 V", Automotive=No, Category=Cap, ComponentLink2Description=Datasheet, ComponentLink2URL=https://content.kemet.com/datasheets/KEM_C1003_C0G_SMD.pdf, Device Class L1="Passive Components", Device Class L2=Capacitors, Device Class L3="Ceramic Capacitors", Digikey Description="CAP CER 33PF 25V 5% NP0 0201", Height=0.33mm, Ipc Land Pattern Name=CAPC6030X30, Lead Free=Yes, Material=Ceramic, Mouser Description="Multilayer Ceramic Capacitors MLCC - SMD/SMT 25volts 33pF C0G 5%", Octopart=https://octopart.com/c0201c330j3gactu-kemet-16237019, RoHS=TRUE, Standoff Height=0mm
C43 C44 C47 C57 C60 C67 C68 C71: library part CMP-06035-011430-1, "Chip Multilayer Ceramic Capacitors for General Purpose, 1206, 47uF, X5R, 15%, 20%, 16V", Capacitance=47uF, Dielectric=X5R, Tolerance=20%, Voltage Rating (DC)=16V, Length=3.2mm, Thickness=1.6mm, Width=1.6mm
C45 C46 C48 C49 C52 C53 C54 C55 C58 C59 C61 C62 C65 C69 C70 C72 C73 C75 C77 C78: library part CMP-00621-81932632-1, "CC0603KRX5R7BB106 Multilayer Ceramic Capacitor, 10 uF, 16 V, ± 10%, X5R, 0603 [1608 Metric]", Capacitance=10µF, Case/Package=0603, Dielectric=X5R, Max Operating Temperature=85°C, Min Operating Temperature=-55°C, Tolerance=10%, Voltage Rating=16V, Halogen Free="Halogen Free", Height=1mm, Lead Free="Lead Free", Material=Ceramic, NexarPartId=81932632, RoHS=Non-Compliant, Voltage Rating (DC)=16V
C50 C63 C66 C74: library part CMP-03422-000237-1, "CAP CER 10000PF 16V X7R 0201", Capacitance="10 nF", Manufacturer=Yageo, Manufacturer Part Number=CC0201KRX7R7BB103, Package=CC0201-BA, Temperature="-55°C to +85°C", Temperature Characteristic=X7R, Temperature Coefficient=15%, Temperature Range High=+85°C, Temperature Range Low=-55°C, Tolerance=0.1, Voltage Rating="16 V", Automotive=No, Category=Cap, ComponentLink2Description=Datasheet, ComponentLink2URL=http://www.yageo.com/documents/recent/UPY-GPHC_X5R_4V-to-50V_25.pdf, Device Class L1="Passive Components", Device Class L2=Capacitors, Device Class L3="Ceramic Capacitors", Digikey Description="CAP CER 10000PF 16V X7R 0201", Footprint Url=http://www.yageo.com/exep/pages/download/literatures/UPY-C_GEN_24.pdf, Height=0.33mm, Ipc Land Pattern Name=CAPC6030X30, Lead Free=Yes, Material=Ceramic, Mouser Description="Multilayer Ceramic Capacitors MLCC - SMD/SMT 10nF 16V X7R 10%", Octopart=https://octopart.com/cc0201krx7r7bb103-yageo-9292627, RoHS=TRUE
C51 C56 C64 C76: library part CMP-2008-03082-2, "CAP CER 0.1UF 16V X7R 0402", Capacitance="0.10 μF", Manufacturer=Kemet, Manufacturer Part Number=C0402C104K4RACAUTO, Package=C0402-BB, Temperature="-55°C to +125°C", Temperature Characteristic=X7R, Temperature Coefficient=15%, Temperature Range High=+125°C, Temperature Range Low=-55°C, Tolerance=0.1, Voltage Rating="16 V", Automotive=No, Category=Cap, ComponentLink2Description=Datasheet, ComponentLink2URL=https://content.kemet.com/datasheets/KEM_C1002_X7R_SMD.pdf, Device Class L1="Passive Components", Device Class L2=Capacitors, Device Class L3="Ceramic Capacitors", Digikey Description="CAP CER 0.1UF 16V X7R 0402", Height=0.55mm, Ipc Land Pattern Name=CAPC10050X50, Lead Free=Yes, Material=Ceramic, Mouser Description="Cap Ceramic 0.1uF 16V X7R 10% Pad SMD 0402 125C Automotive T/R", Octopart=https://octopart.com/c0402c104k4racauto-kemet-17309149, RoHS=TRUE
FB1: library part CMP-1395-00002-2, Case Code (Imperial)=1812, Case Code (Metric)=4532, Current Rating=8A, DC Resistance (DCR)=4.5mΩ, Frequency=1.1GHz, Max Operating Temperature=125°C, Min Operating Temperature=-55°C, Test Frequency=100MHz, Tolerance=25%, Case/Package=1812, Depth=3.2mm, Height=2.3mm, Impedance=100Ω, Lead Free="Lead Free", Length=4.5mm, Material="Ferrite, Steel", Max Current Rating=8A, Max DC Current=8A, Mount="Surface Mount", NexarPartId=21273894, Number of Lines=1, Packaging=Digi-Reel®, REACH SVHC=Unknown, RoHS=Compliant, Termination=SMD/SMT, Width=3.2mm
J1: library part CMP-1502-00190-4, "DC Power Jack Connector WR-DC, Male, Right Angled, THT, 5 A, 24 V", Color=Black, Current Rating=5A, Flammability Rating="UL94 V-0", Insulation Resistance=100MΩ, Max Operating Temperature=85°C, Min Operating Temperature=-40°C, Operating Supply Voltage=24V, Voltage Rating=30V, Connector Type=Power, Contact Gender=Female, Contact Material="Gold, Tin", Contact Plating=Tin, Gender=Male, Height=11mm, Housing Material=Polyamide, Mount="Through Hole", Number of Contacts=3, Packaging=Bulk, REACH SVHC=Unknown, RoHS=Compliant, Shielding=Unshielded, Termination="Through Hole"
L1: library part CMP-11268-000097-1, "Fixed Inductor 1uH Shld 20% 16A 6.95mOhms AECQ2", RoHS Compliant=Yes
L2 L3 L4: library part SRP4020FA-2R2M, "Inductor", Manufacturer_Name=Bourns, Mouser Part Number=652-SRP4020FA-2R2M, Arrow Part Number=SRP4020FA-2R2M, Arrow Price/Stock=https://www.arrow.com/en/products/srp4020fa-2r2m/bourns.html?utm_currency=USD&region=nac, Datasheet Link=https://www.bourns.com/docs/Product-Datasheets/SRP4020FA.pdf, Height=2.1mm, Manufacturer_Part_Number=SRP4020FA-2R2M, Mouser Price/Stock=https://www.mouser.co.uk/ProductDetail/Bourns/SRP4020FA-2R2M?qs=MLItCLRbWswKB3debRJXpA%3D%3D
R1: library part CMP-02407-000443-1, "RES SMD 1.2K OHM 1% 1/10W 0402", Case Code (Imperial)=0402, Case Code (Metric)=1005, Max Operating Temperature=125°C, Max Power Dissipation=100mW, Min Operating Temperature=-55°C, Package Quantity=1, Power Rating=63mW, Resistance=1MR, Temperature Coefficient=50ppm/°C, Tolerance=1%, Voltage Rating=50V, Case/Package=0402, Composition="Thin Film", Contact Plating=Tin, Depth=0.5mm, Height=0.015inch, Lead Free="Lead Free", Length=1mm, Military Standard=Not, Mount="Surface Mount", Number of Terminations=2, Packaging="Tape and Reel", Radiation Hardening=No, REACH SVHC="No SVHC", Voltage Rating (DC)=50V, Weight=2.1E-05oz, Width=0.5mm
R2: library part CMP-2002-08399-1, Manufacturer="Vishay Dale", Part Number=CRCW0402243KFKED
R3: library part CMP-2002-05709-1, Manufacturer="TE Connectivity / AMP", Part Number=CRG0402F20K
R4 R11 R17: library part CMP-2002-01682-1, Manufacturer="Vishay BCcomponents", Part Number=TNPW040210K0DEED
R5 R12 R18: library part CMP-2002-08122-2, "RES Thick Film, 0Ω, 0.063W, 0402", Case Code (Imperial)=0402, Case Code (Metric)=1005, Max Operating Temperature=155°C, Max Power Dissipation=63mW, Min Operating Temperature=-55°C, Package Quantity=1, Resistance=0mR, Temperature Coefficient=100ppm/°C, Tolerance=5%, Voltage Rating=50V, Case/Package=0402, Composition="Thick Film", Contact Plating=Tin, Depth=0.5mm, Features="Automotive AEC-Q200", Height=0.35mm, Lead Free="Lead Free", Length=1mm, Military Standard=Not, Mount="Surface Mount", Number of Terminations=2, Packaging="Tape and Reel", Power Rating=63mW, Radiation Hardening=No, Termination=SMD/SMT, Voltage Rating (DC)=50V, Weight=2.3E-05oz, Width=0.5mm
R6 R13 R19: library part CMP-03211-001412-1, "CRGCQ0402 100KΩ 1% ±100ppm/°C 50V", Ambient Temperature Range High=+70°C, Manufacturer="TE Connectivity", Manufacturer Part Number=CRGCQ0402F100K, Package=CRGCQ0402, Power Rating=0.0625W, Resistance=100KΩ, Temperature="-55°C to +155°C", Temperature Coefficient=±100ppm/°C, Temperature Range High=+155°C, Temperature Range Low=-55°C, Tolerance=0.01, Voltage Rating=50V, Automotive=Yes, Category=Res, ComponentLink2Description=Datasheet, ComponentLink2URL=https://www.te.com/commerce/DocumentDelivery/DDEController?Action=showdoc&DocId=Data+Sheet%7F1773204-3%7F1%7Fpdf%7FEnglish%7FENG_DS_1773204-3_1.pdf%7F4-2176347-1150, Composition="Thick Film", Device Class L1="Passive Components", Device Class L2=Resistors, Device Class L3="Chip SMD Resistors", Height=0.4mm, Ipc Land Pattern Name=RESC10050X35, Lead Free=Yes, Octopart=https://octopart.com/crgcq0402f100k-te+connectivity-91017930, RoHS=TRUE, Series=CRGCQ
R7 R14 R20: library part CMP-03412-042796-1, "Anti-Sulfurated Chip Resistors Automotive Grade 1kΩ 1% 200ppm/°C 0201", Case/Package=0201, Max Operating Temperature=125°C, Max Power Dissipation=50mW, Min Operating Temperature=-55°C, Resistance=1kR, Resistor Type="Thick Film", Temperature Coefficient=200ppm/°C, Tolerance=1%, Features="Moisture Resistant", Height=0.01inch, Length=0.024inch, Number of Terminations=2, Packaging="Tape and Reel", RoHS Compliant=Yes, Series=AF, Width=0.012inch
R8 R15 R21: library part CMP-03412-022855-2, "RES 100Ω ±1% 0.063W 0402", Case/Package=0402, Resistance=100R, Tolerance=1%, RoHS Compliant=Yes
R9: library part CMP-03412-038922-1, "Thin Film Chip Resistors Automotive Grade 40kΩ 0.1% 25ppm/°C 0603"
R10: library part CMP-02407-012302-1, "RES SMD 5K OHM 0.1% 1/20W 0402", Case Code (Imperial)=0402, Case Code (Metric)=1005, Max Operating Temperature=155°C, Max Power Dissipation=50mW, Min Operating Temperature=-55°C, Package Quantity=1000, Resistance=5kR, Resistor Type="Thin Film", Temperature Coefficient=25ppm/°C, Tolerance=0.1%, Case/Package=0402, Features="Moisture Resistant", Height=0.033inch, Length=0.042inch, Number of Terminations=2, Packaging="Tape and Reel", RoHS Compliant=Yes, Width=0.022inch
R16: library part CMP-2002-06075-1, Manufacturer=Multicomp, Part Number=MC00625W0402125K5
R22: library part CMP-2004-00049-1, Manufacturer="Vishay Dale", Part Number=CRCW020111K8FNED
R23: library part CMP-2004-00570-1, Manufacturer="Vishay Dale", Part Number=CRCW02013K74FNED
R24 R25 R28 R33: library part RNCF0805BTE250K, "Resistor", Manufacturer_Name="Stackpole Electronics", Arrow Part Number=RNCF0805BTE250K, Arrow Price/Stock=https://www.arrow.com/en/products/rncf0805bte250k/stackpole-electronics?utm_currency=USD&region=nac, Datasheet Link=https://www.seielect.com/catalog/sei-rncf.pdf, Height=0.65mm, Manufacturer_Part_Number=RNCF0805BTE250K
R26: library part CMP-2004-03223-1, Manufacturer=Panasonic, Part Number=ERJ-1GNF1242C
R27: library part CMP-2004-00016-1, Manufacturer="Vishay Dale", Part Number=CRCW020110K0FNED
R29 R32: library part CMP-04015-035147-1, "19.3kΩ ±0.1% 0.063W, 1/16W Chip Resistor 0402 (1005 Metric) Moisture Resistant Thin Film"
R30 R31: library part CMP-1010-00538-2, Manufacturer=Panasonic, Part Number=ERJ-1GNF1212C
R34 R35 R36: library part CMP-03412-040628-1, "Anti-Sulfurated Chip Resistors Automotive Grade 26.1kΩ 1% 100ppm/°C 0402", Case/Package=0402, Max Operating Temperature=155°C, Max Power Dissipation=63mW, Min Operating Temperature=-55°C, Resistance=26.1kR, Resistor Type="Thick Film", Temperature Coefficient=100ppm/°C, Tolerance=1%, Features="Moisture Resistant", Height=0.015inch, Length=0.039inch, Number of Terminations=2, Packaging="Tape and Reel", RoHS Compliant=Yes, Series=AF, Width=0.02inch
U1: library part CMP-09139-000710-1, "IC REG BUCK ADJUSTABLE 8A 32LQFN", Max Input Voltage=65V, Max Operating Temperature=125°C, Min Input Voltage=3.4V, Min Operating Temperature=-40°C, Output Current=8A, Output Voltage=25V, Package Quantity=490, Quiescent Current=400uA, Switching Frequency=2.2MHz, Min Supply Voltage=3.4V, Number of Outputs=1, Number of Pins=32, Packaging=Rail/Tube, RoHS Compliant=Yes, Series=LT8645S
U2 U3 U4: library part CMP-04918-000597-1, "LM61460AAN PRODUCTION MATERIAL"
U5 U6 U7 U8: library part CMP-04917-000343-1, "IC REG LINEAR POS ADJ 2A 12VQFN"

## Nets (pads, with @x,y where several pads share a name; then routed paths per layer and width w, separated by ;. In a path a pad name is that pad's centre, name@x,y a point inside that pad or via, vN(x,y) a via of type N, cw(c..) or ccw(c..) an arc to the next point about the centre after c; other vN are vias at no path point)
1v0: C33.2 C38.1 C39.1 C40.1 L4.2 R17.2 R19.2 R20.1
1v8: C22.2 C27.1 C28.1 C29.1 L3.2 R11.2 R13.2 R14.1
3v3: C11.2 C16.1 C17.1 C18.1 L2.2 R4.2 R6.2 R7.1
5V: C8.1 C12.1 C13.1 C14.1 C19.1 C23.1 C24.1 C25.1 C30.1 C34.1 C35.1 C36.1 C41.1 L1.2 R1.2 R5.1 R12.1 R18.1 U2.8 U2.12 U3.8 U3.12 U4.8 U4.12
+1v3: C66.1 C67.2 C68.2 C69.1 C70.1 C74.1 C75.1 C78.1 R30.2 R31.2 U6.10 U6.11 U8.10 U8.11
+1v8: C43.2 C53.1 C54.1 C57.2 C58.1 C59.1 C63.1 C71.2 C72.1 C73.1 R26.2 U6.1 U6.2 U6.3 U7.10 U7.11 U8.1 U8.2 U8.3
+3v3: C44.2 C45.1 C46.1 C50.1 R22.2 U5.10 U5.11
+5: C47.2 C48.1 C49.1 C60.2 C61.1 C62.1 U5.1 U5.2 U5.3 U7.1 U7.2 U7.3
+12: C3.2 FB1.1 J1.1
BST: C9.1 U1.11
BST_SW: C9.2 L1.1 U1.12 U1.13 U1.14 U1.15 U1.16
FB1: C20.2 R6.1 R9.1 U2.4
FB2: C31.2 R13.1 R16.2 U3.4
FB3: C42.2 R19.1 U4.4
GND: C1.2 C2.2 C3.1 C4.1 C5.1 C6.1 C8.2 C10.2 C12.2 C13.2 C14.2 C16.2 C17.2 C18.2 C21.2 C23.2 C24.2 C25.2 C27.2 C28.2 C29.2 C32.2 C34.2 C35.2 C36.2 C38.2 C39.2 C40.2 C43.1 C44.1 C45.2 C46.2 C47.1 C48.2 C49.2 C52.2 C53.2 C54.2 C55.2 C57.1 C58.2 C59.2 C60.1 C61.2 C62.2 C65.2 C68.1 C69.2 C70.2 C71.1 C72.2 C73.2 C77.2 J1.2 J1.3 R2.1 R3.1 R10.2 R16.1 R23.1 R24.1 R25.1 R27.1 R28.1 R29.1 R32.1 R33.1 R34.1 R35.1 R36.1 U1.8 U1.9 U1.10 U1.17 U1.18 U1.19 U1.30 U1.33 U1.34 U1.35 U1.36 U1.37 U1.38 U1.39 U1.40 U1.41 U1.42 U2.3 U2.9 U2.11 U3.3 U3.9 U3.11 U4.3 U4.9 U4.11 U5.6 U5.7 U5.12 U7.6 U7.7 U7.12 U8.6 U8.7 U8.12
Main_clk: C19.2 C30.2 C41.2 U1.27
NetC2_1: C2.1 C4.2 C5.2 C6.2 FB1.2 U1.4 U1.5 U1.6 U1.21 U1.22 U1.23 U1.25
NetC7_1: C7.1 U1.1
NetC7_2: C7.2 R1.1 R2.2 U1.32
NetC10_1: C10.1 U2.2
NetC11_1: C11.1 U2.1
NetC15_1: C15.1 U2.14
NetC15_2: C15.2 L2.1 R8.2 U2.10
NetC20_1: C20.1 R7.2
NetC21_1: C21.1 U3.2
NetC22_1: C22.1 U3.1
NetC26_1: C26.1 U3.14
NetC26_2: C26.2 L3.1 R15.2 U3.10
NetC31_1: C31.1 R14.2
NetC32_1: C32.1 U4.2
NetC33_1: C33.1 U4.1
NetC37_1: C37.1 U4.14
NetC37_2: C37.2 L4.1 R21.2 U4.10
NetC42_1: C42.1 R20.2
NetC50_2: C50.2 R22.1 R23.2 U5.9
NetC51_1: C51.1 R24.2
NetC51_2: C51.2 U5.4
NetC52_1: C52.1 U5.5
NetC55_1: C55.1 U6.5
NetC56_1: C56.1 R25.2
NetC56_2: C56.2 U6.4
NetC63_2: C63.2 R26.1 R27.2 U7.9
NetC64_1: C64.1 R28.2
NetC64_2: C64.2 U7.4
NetC65_1: C65.1 U7.5
NetC66_2: C66.2 R29.2 R30.1 U6.9
NetC67_1: C67.1 C75.2 C78.2 U6.6 U6.7 U6.12
NetC74_2: C74.2 R31.1 R32.2 U8.9
NetC76_1: C76.1 R33.2
NetC76_2: C76.2 U8.4
NetC77_1: C77.1 U8.5
NetR3_2: R3.2 U1.26
NetR4_1: R4.1 U2.5
NetR5_2: R5.2 U2.7
NetR8_1: R8.1 U2.13
NetR9_2: R9.2 R10.1
NetR11_1: R11.1 U3.5
NetR12_2: R12.2 U3.7
NetR15_1: R15.1 U3.13
NetR17_1: R17.1 U4.5
NetR18_2: R18.2 U4.7
NetR21_1: R21.1 U4.13
NetR34_2: R34.2 U2.6
NetR35_2: R35.2 U3.6
NetR36_2: R36.2 U4.6
sync: C1.1 U1.2 U1.28
pads on no net: U1.3 U1.7 U1.20 U1.24 U1.29 U1.31 U5.8 U6.8 U7.8 U8.8